# Altium PCB MotorDriver-v1.0.PcbDoc (part 3 of 3)
Units mil, origin at the board's own origin, x right, y up, seen from the top; angles counter-clockwise.
Board outline 4842.52 x 3661.42 mil, 2 copper layers (Top Layer, Bottom Layer), stack 57 mil thick; 127 components, 90 nets, 380 pads, 96 vias.
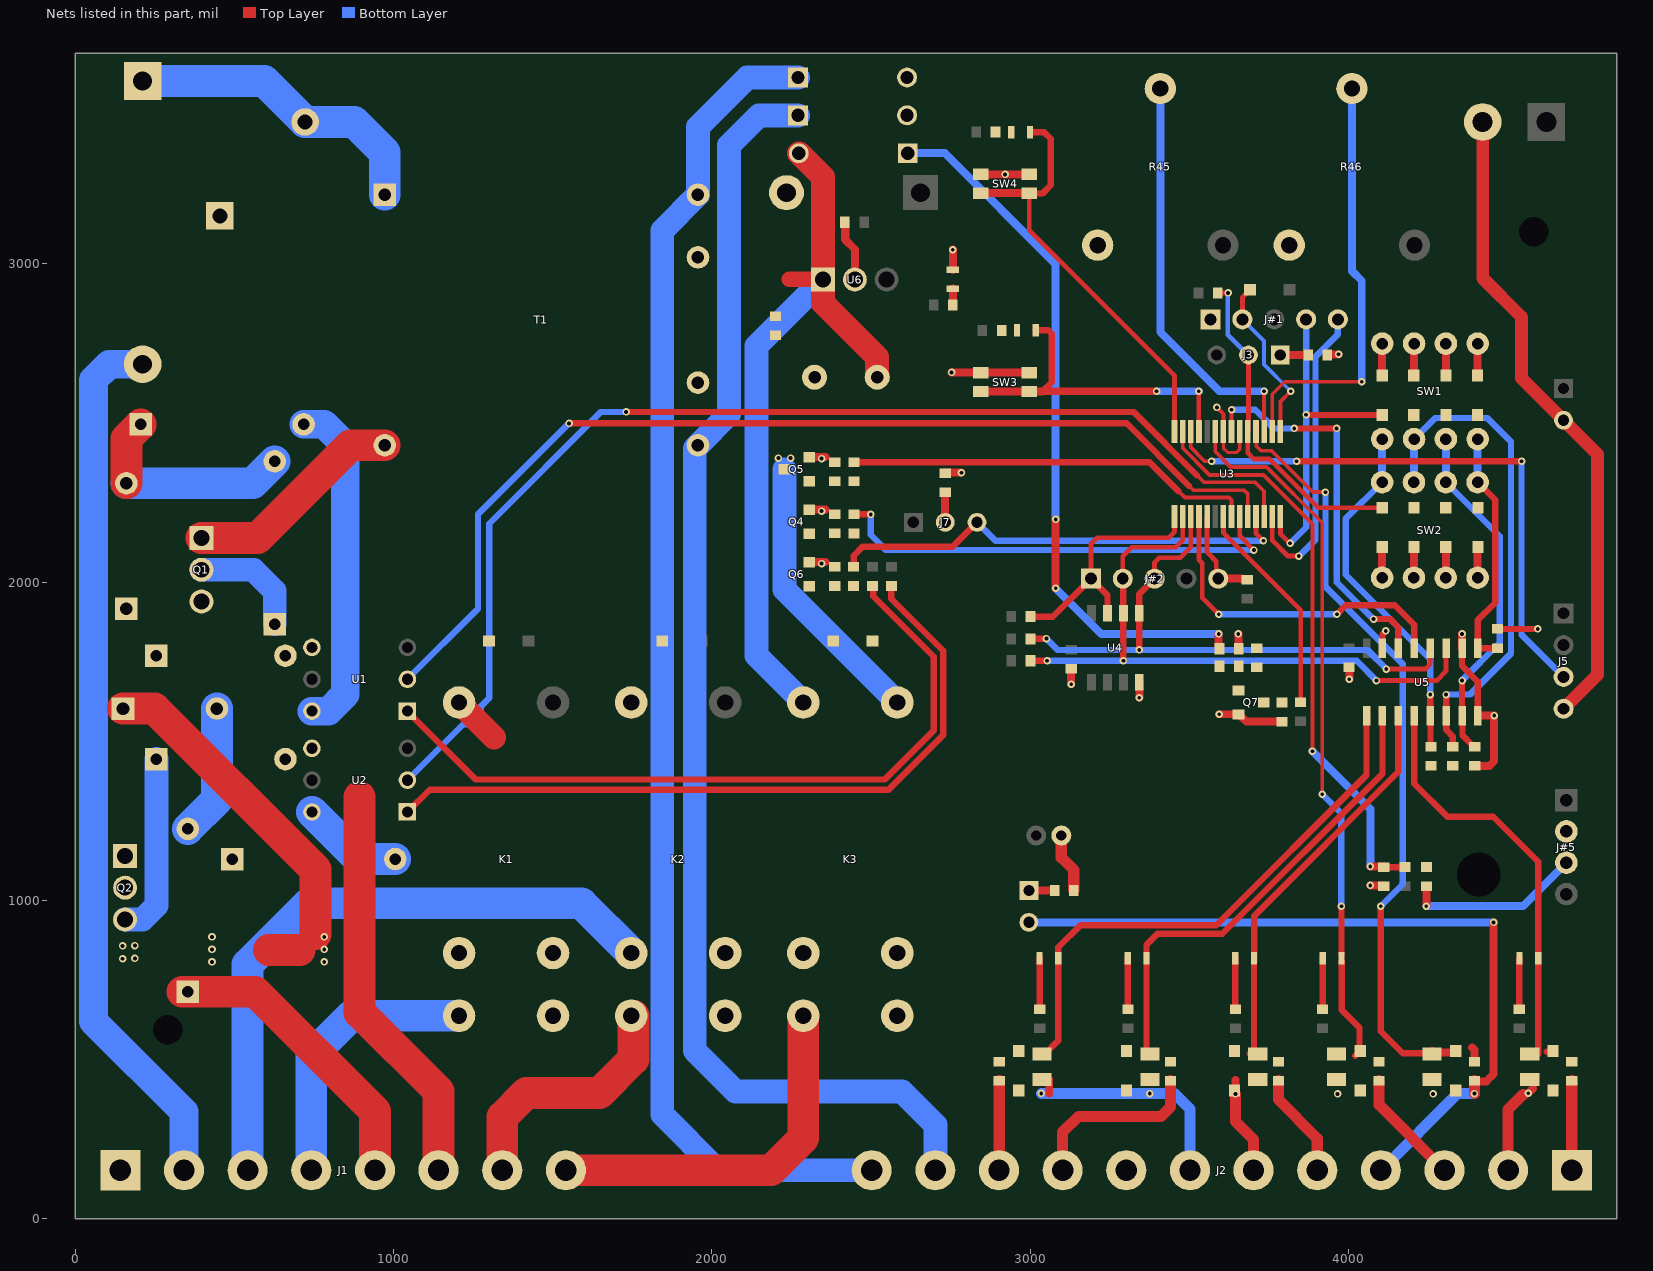
[diagram p2: the nets of this part, all layers, seen from the top]

## Via types
v1: diameter 23.62, hole 11.81, Top Layer to Bottom Layer, 96 vias

## Nets (pads, with @x,y where several pads share a name; then routed paths per layer and width w, separated by ;. In a path a pad name is that pad's centre, name@x,y a point inside that pad or via, vN(x,y) a via of type N, cw(c..) or ccw(c..) an arc to the next point about the centre after c; other vN are vias at no path point) (continued)
"Coil 3": D3.1 K3.8 Q5.3 | length 879.8
  Bottom Layer w75: 2228,2355 2228,1976.52 K3.8@2582.46,1622.06
  other v1: 2209,2390 2247,2390
Costa: J2.4 J8.2 R42.2 | length 2441.4
  Top Layer w25: R42.2@4396,433.4 4397.93,431.46 4433.46,431.46 4456,454 v1(4456,931)
  Top Layer w35: v1(4396,393) R42.2@4396,433.4
  Bottom Layer w25: J8.2@2996,931 v1(4456,931)
  Bottom Layer w35: J2.4@4102,152 4343,393 v1(4396,393)
D0: C13.2 D10.2 LED18.2 R39.1 U5.1 | length 1745.7
  Top Layer w20: C13.2@3037,517.4 3042.4,512 3042.4,513.9 3088.53,560.03 LED18.2@3088.53,818 3088.53,852.53 3158,922 3585,922 4057,1394 U5.1@4057,1579.7
D1: C14.2 D11.2 LED19.2 R40.1 U5.2 | length 1492.9
  Top Layer w20: C14.2@3375,517.4 3365.53,526.87 LED19.2@3365.53,818 3365.53,860.53 3400,895 3604,895 4107,1398 U5.2@4107,1579.7
D2: C15.2 D12.2 LED20.2 R41.1 U5.3 | length 1244.3
  Top Layer w20: C15.2@3689.03,518.5 3703.53,533 LED20.2@3703.53,798.53 ; LED20.2@3704,809.11 3704,951 4157,1404 U5.3@4157,1579.7
D3: C18.2 D14.2 LED22.2 R44.1 U5.4 | length 1315.5
  Top Layer w20: U5.4@4207,1579.7 4207,1367 4311.43,1262.57 4455.43,1262.57 4596.53,1121.47 LED22.2@4596.53,818 C18.2@4596.53,517.4 ; 4623.51,524.01 D14.2@4631,524.01
D4: R11.1 SW1.1 SW2.2 U5.5 | length 1124.8
  Top Layer w12: U5.5@4257,1579.7 U5.5@4258,1578.7 ; R11.1@4258,1484 R11.1@4259,1483
  Top Layer w15: R11.1@4258.85,1482.15 R11.1@4259,1482
  Top Layer w20: U5.5@4257,1579.7 v1(4257,1647) ; R11.1@4258,1484 U5.5@4258,1578.7
  Bottom Layer w12: SW2.2@4106,2314 SW2.2@4106.15,2314.15 ; SW1.1@4106.15,2449.53 SW1.1@4106.3,2449.68
  Bottom Layer w20: SW2.2@4106,2314 3992,2200 3992,2023 4257,1758 v1(4257,1647)
  Bottom Layer w25: SW2.2@4106.15,2314.15 SW1.1@4106.15,2449.53
D5: R16.1 SW1.3 SW2.4 U5.6 | length 1594.2
  Top Layer w20: v1(4307,1647) U5.6@4307,1579.7 4307,1536 4328,1515 R16.1@4328,1483
  Bottom Layer w20: SW2.4@4206,2314 SW2.4@4206.15,2314.15 ; SW1.3@4206.15,2449.53 SW1.3@4206.3,2449.68 4272.62,2516 4436,2516 4511,2441 4511,1776 4382,1647 v1(4307,1647)
  Bottom Layer w25: SW2.4@4206.15,2314.15 SW1.3@4206.15,2449.53
D6: R29.1 SW1.5 SW2.6 U5.7 | length 1104.5
  Top Layer w20: v1(4357,1691) U5.7@4357,1579.7 4358.52,1578.18 4358.52,1518.98 4389.5,1488 4392,1488 R29.1@4397,1483
  Bottom Layer w20: SW2.6@4306.15,2314.15 SW2.6@4306,2314 4476,2144 4476,1810 v1(4357,1691) ; SW1.5@4306.15,2449.53 SW1.5@4306.3,2449.68
  Bottom Layer w25: SW2.6@4306.15,2314.15 SW1.5@4306.15,2449.53
D7: R25.1 SW1.7 SW2.8 U5.9 | length 766.2
  Top Layer w15: U5.9@4407,1792.3 U5.9@4407.3,1792 ; 4407,1881 4408,1880
  Top Layer w20: SW2.8@4406,2314 4461,2259 4461,1935 4407,1881 U5.9@4407,1792.3 ; U5.9@4407.3,1792 4468,1792 R25.1@4469,1793
  Bottom Layer w25: SW2.8@4406.3,2314.3 SW1.7@4406.3,2449.68
DC#: C7.1 D4.1 D5.2 D6.2 R26.2 | length 2246.3
  Top Layer w25: v1(3080,1981) v1(3080,2197.06) ; v1(3592.5,1837.5) 3592.5,1793.5 C7.1@3595,1791
  Bottom Layer w25: D4.1@2616.32,3348 2732,3348 3080,3000 v1(3080,2197.06) ; v1(3080,1981) 3223.5,1837.5 v1(3592.5,1837.5)
ENC: J#5.3 R32.2 | length 559.5
  Top Layer w25: v1(4245,982) R32.2@4245,1045
  Bottom Layer w25: v1(4245,982) 4548.57,982 J#5.3@4685,1118.43
ENC#: C12.1 R31.2 R32.1 U3.13 | length 1820.2
  Top Layer w12: U3.13@3479.25,2473.86 3479.25,2421.75 3564,2337 3733,2337 3887,2183 v1(3887,1469) ; C12.1@4116,1104 C12.1@4116.25,1104.25
  Top Layer w20: v1(4069,1107) v1@4069.69,1106.31 ; C12.1@4113.69,1106.31 4116,1104 R31.2@4177.5,1104
  Top Layer w25: v1@4069.69,1106.31 C12.1@4113.69,1106.31
  Bottom Layer w25: v1(3887,1469) 4069,1287 v1(4069,1107)
GND: C3.2 C4.1 C5.2 C6.1 C7.2 C8.2 C9.2 C10.1 C11.2 C12.2 C15.1 C16.1 C17.1 C18.1 C20.1 D7.2 D9.1 D12.1 D13.1 D14.1 J2.2 J2.6 J4.2 J5.4 J#1.1 J#2.5 J#4.2 J#5.2 LED16.2 Q4.2 Q5.2 Q6.2 Q7.2 R10.1 R11.2 R13.2 R16.2 R17.2 R21.2 R25.2 R27.2 R29.2 R30.2 R45.1 R46.1 SW3.1 SW4.1 T1.7 T1.9 U3.6 U3.8 U3.19 U4.4 U5.8 U5.10 U5.15 U6.2 | length 5493.4
  Top Layer w10: U3.8@3607.2,2473.86 3607.2,2420.8 3620,2408 3649,2408 3658.39,2417.39 U3.6@3658.39,2473.86
  Top Layer w12: v1(3587,2549) 3607.2,2528.8 U3.8@3607.2,2473.86
  Top Layer w15: U3.19@3556.02,2206.14 3556.02,2093.98 3585,2065 3585,2017 J#2.5@3591,2011
  Top Layer w20: U5.15@4107,1792.3 4106.98,1836.98 v1(4117,1847) ; U5.10@4357,1792.3 4357,1737 4407,1687 U5.8@4407,1579.7 ; R25.2@4469,1853 v1(4595,1853)
  Top Layer w25: Q6.2@2307.37,2063.4 2357.37,2063.4 ; Q4.2@2307.37,2228.4 2357.37,2228.4 ; Q5.2@2307.37,2393.4 2357.37,2393.4 ; C3.2@2418,3131 2418,3077 2449,3046 U6.2@2449,2951 ; 2419,3085.29 C3.2@2419,3135.29 ; C6.1@2734,2344 v1(2784,2344) ; v1(2753,2659) 2753.47,2658.53 SW3.1@2845.21,2658.53 SW3.1@2996.79,2658.53 ; LED16.2@2757,2981.53 v1(2757,3045) ; SW4.1@2845.21,3281.53 v1(2921,3281.53) SW4.1@2996.79,3281.53 ; v1(3129,1679.27) C8.2@3129,1728 ; R45.1@3212.15,3058.94 R45.1@3214.21,3061 ; v1(3343,1637) U4.4@3343,1685.73 ; J#2.5@3591,2011 3591.11,2010.89 3664.28,2010.89 3664.68,2010.5 3679.5,2010.5 C20.1@3682,2008 ; v1(3594,1585) 3654.23,1585 Q7.2@3654.63,1584.6 3656.6,1584.6 3679.2,1562 C9.2@3791,1562 ; v1(3645,392) 3645,436 ; C7.2@3654,1792 v1(3654,1837.5) ; R10.1@3934,2714 3936,2716 v1(3969,2716) ; v1(4003,1695) C10.1@4003,1733 ; v1@4069.69,1046.31 C12.2@4113.69,1046.31 ; U5.10@4357,1792.3 v1(4357,1837.5) ; R29.2@4397,1423 4443.36,1423 4458,1437.64 v1(4458,1580.7) U5.8@4408,1580.7 ; 4548.5,389.5 4553.04,394.04 v1(4564.99,394.04) 4579.76,408.8 ; C18.1@4565,437.4 4567.5,437.4 C18.1@4575,429.9
  Top Layer w35: C11.2@3097.74,1204 3097.74,1134.26 3137,1095 R30.2@3137,1032 ; v1(3645,392) 3645,305 3702,248 J2.6@3702,152 ; J2.2@4502,152 4502,343 4548.5,389.5
  Top Layer w40: J#4.2@4422,3446 4422,2955 4544,2833 4544,2641 J4.2@4676,2509 4783,2402 4783,1709.26 J5.4@4676.07,1602.34
  other v1: 3966,392 4266,392 4069,1047 2344.37,2058.4 2344.37,2223.4 2344.37,2388.4
LINE: J1.2 J1.3 J10.2 K2.3 K2.6 K3.3 K3.6 | length 4776.9
  Bottom Layer w75: J10.2@208.13,2682.25 J10.2@211,2685.12
  Bottom Layer w90: J10.2@211,2685.12 106.22,2685.12 56.43,2635.33 56.43,620.57 341,336 J1.2@341,152
  Bottom Layer w100: J1.3@541,152 541,799 733,991 1589.84,991 K2.3@1746.18,834.66
LSC: J2.10 R39.2 | length 280.4
  Top Layer w35: J2.10@2903,153 R39.2@2903,433.4
LSO: J2.9 R40.2 | length 573.8
  Top Layer w35: J2.9@3102,152 3102,272 3151.32,321.32 3410.81,321.32 3441,351.52 R40.2@3441,433.4
NetC2_2: C2.2 R5.1 R6.2 | length 416.1
  Bottom Layer w100: R6.2@353,1224.81 444.64,1316.45 C2.2@444.64,1603
NetC6_2: C6.2 J7.2 | length 95
  Top Layer w25: J7.2@2733,2188 C6.2@2733,2283
NetC19_2: C19.2 R1.1 R2.2 | length 698.4
  Top Layer w100: C19.2@160,2310.85 160,2450.91 R1.1@205.09,2496
  Bottom Layer w100: C19.2@160,2310.85 556.94,2310.85 R2.2@626,2379.91
NetJ3_1: J3.1 R10.2 | length 88
  Top Layer w25: J3.1@3786,2714 R10.2@3874,2714
NetJ8_1: J8.1 R30.1 | length 81
  Top Layer w25: J8.1@2996,1031 R30.1@3077,1031
NetJ10_1: J10.1 RV1.2 T1.1 | length 986.4
  Bottom Layer w100: J10.1@211,3574.88 593.11,3574.88 RV1.2@721.72,3446.28 875.72,3446.28 971.87,3350.13 T1.1@971.87,3217.7
NetLED15_1: LED15.1 R7.2
NetLED16_1: LED16.1 R8.2 | length 51.5
  Top Layer w25: R8.2@2757,2871 LED16.1@2757,2922.47
NetLED17_1: LED17.1 R9.2
NetLED18_1: LED18.1 R33.2 | length 159.8
  Top Layer w20: LED18.1@3029.74,817.74 3029.74,658.77 R33.2@3030,658.51
  Top Layer w25: R33.2@3030,658 R33.2@3030,658.51
NetLED19_1: LED19.1 R34.2 | length 159.8
  Top Layer w20: LED19.1@3306.74,817.74 3306.74,658.77 R34.2@3307,658.51
  Top Layer w25: R34.2@3307,658 R34.2@3307,658.51
NetLED20_1: LED20.1 R35.2 | length 159.8
  Top Layer w20: LED20.1@3644.74,817.74 3644.74,658.77 R35.2@3645,658.51
  Top Layer w25: R35.2@3645,658 R35.2@3645,658.51
NetLED21_1: LED21.1 R36.2 | length 159.7
  Top Layer w20: R36.2@3919,658.51 3919,808 3919.47,808.47 LED21.1@3919.47,818
NetLED22_1: LED22.1 R38.2 | length 159.5
  Top Layer w20: R38.2@4537,658.51 LED22.1@4537,818
NetQ1_3: Q1.3 R3.1
NetQ2_3: Q2.3 R4.1 | length 576.4
  Bottom Layer w75: Q2.3@156,940 210.25,940.04 254.24,984.03 R4.1@254.24,1444
NetQ4_1: Q4.1 R13.1 R14.1
NetQ5_1: Q5.1 R17.1 R18.1
NetQ6_1: Q6.1 R21.1 R22.1
NetQ7_1: Q7.1 R26.1 R27.1
NetR1_2: R1.2 U1.6 | length 1067.4
  Bottom Layer w90: R1.2@716.91,2496 782,2496 848,2430 848,1648 795,1595 U1.6@743,1595
NetR3_2: R3.2 U1.4
NetR4_2: R4.2 U2.4
NetR5_2: R5.2 U2.6 | length 323.2
  Bottom Layer w100: U2.6@743,1278 891,1130 R5.2@1004.91,1130
NetR23_1: R23.1 U1.1 | length 2340.5
  Top Layer w20: U1.1@1043,1595 1258,1380 2543,1380 2697,1534 2697,1766 2507.3,1955.7 2507.3,1985.37 R23.1@2504.67,1988
NetR24_1: R24.1 U2.1 | length 2319.8
  Top Layer w20: U2.1@1043,1278 1112.78,1347.78 2554.78,1347.78 2727,1520 2727,1785 2564,1948 R24.1@2564,1988
Neutral: C2.1 C19.1 J1.1 K1.3 K1.6 Q1.1 Q2.1 RV1.1 T1.5 | length 1811.1
  Top Layer w100: C2.1@149.36,1603 248,1603 754,1097 754,893.81 ; Q1.1@396,2139 573,2139 864.3,2430.3 T1.5@971.87,2430.3 ; 608,844.5 704.69,844.5
  Bottom Layer w50: K1.3@1192.02,835 K1.3@1192.36,834.66
  other v1: 429,806.8 782,806.8 147.81,816.8 187,817.8 429,846 782,846 147.81,857 187,858 429,885.2 782,885.2
OPT1: J1.5 Q2.2 R6.1 | length 945.7
  Top Layer w100: R6.1@336,713 565,713 941,337 J1.5@941,152
OPT2: J1.6 Q1.2 R2.1 | length 1638.5
  Top Layer w100: 893,1325.48 893,648 1141,400 J1.6@1141,152
  Bottom Layer w75: Q1.2@396,2039 560,2039 626,1973 R2.1@626,1868.09
PED.: J2.3 R43.2 | length 366.7
  Top Layer w35: R43.2@4096,433.4 4096,358 J2.3@4302,152
PHO: J2.5 R41.2 | length 331.9
  Top Layer w35: R41.2@3780,433.4 3780,374 3902,252 J2.5@3902,152
PRG: LED15.2 SW4.2 U3.14 | length 1387.5
  Top Layer w15: SW4.2@2996.79,3222.47 2996.79,3105.21 3453.66,2648.34 3453.66,2526.34 U3.14@3453.66,2473.86
  Top Layer w20: SW4.2@2997.87,3221.39 3038.61,3221.39 3065,3247.77 3065,3393 3044.67,3413.33 ; LED15.2@2999.53,3414 3044,3414
  Top Layer w25: SW4.2@2845.21,3222.47 SW4.2@2996.79,3222.47 SW4.2@2997.87,3221.39
PRT: LED17.2 SW3.2 U3.11 | length 1058.2
  Top Layer w15: U3.11@3530,2474.29 v1(3530,2600)
  Top Layer w20: LED17.2@3017.53,2792 3056.28,2792 3068,2780.28 3068,2628.76 3038.71,2599.47
  Top Layer w25: SW3.2@2845.21,2599.47 SW3.2@2996.79,2599.47 3038.71,2599.47 ; 3039.24,2600 v1(3397,2600)
  Bottom Layer w25: v1(3397,2600) v1(3530,2600)
RA0: R46.2 U3.2 | length 1348.3
  Top Layer w12: U3.2@3760.75,2473.86 3760.75,2590.75 3800,2630 v1(4042,2630)
  Bottom Layer w25: R46.2@4011,3551.06 4011,2978 4042,2947 v1(4042,2630)
RA1: R45.2 U3.3 | length 1294.4
  Top Layer w12: U3.3@3735.16,2473.86 v1(3735.16,2600)
  Bottom Layer w25: R45.2@3409,3551.06 3409,2786 3595,2600 v1(3735.16,2600)
RA2: C16.2 D9.2 R42.1 U3.4 | length 2439.7
  Top Layer w12: U3.4@3709.57,2473.86 3710.22,2473.21 3710.22,2427.78 3725,2413 3758,2413 3888,2283 v1(3928,2283)
  Top Layer w20: v1(4102,982) 4102,589 4171,520 4260.4,520 C16.2@4263,517.4
  Top Layer w25: C16.2@4263,521.5 4314.5,521.5 ; C16.2@4263.69,524.9 C16.2@4263.69,526.36 ; 4388,538.28 4395.99,530.28 R42.1@4395.99,492.89
  Bottom Layer w20: v1(3928,2283) 3928,1986 4171,1743 4171,1051 v1(4102,982)
RA3: D#2.1 D#3.1 D#4.1 D#5.1 J3.2 R12.1 U3.5 | length 1059.4
  Top Layer w15: R12.1@3590,2908 R12.1@3589,2909 v1(3622,2909) ; J3.2@3686,2714 3686,2510.55 3685.33,2509.89 3685.33,2475.22 U3.5@3683.98,2473.86 3683.98,2406.02 3703,2387 3753,2387 3905.99,2234.01 D#2.1@4106,2234.01
  Bottom Layer w15: v1(3622,2909) 3621,2908 3621,2777 J3.2@3685,2713
RA5: U3.7 U5.14 | length 1224.1
  Top Layer w12: U3.7@3632.8,2473.86 v1@3632.8,2541.8
  Top Layer w20: v1(3830,2483) v1(3963,2483) ; v1(4079,1884) 4079.19,1884.19 4130.81,1884.19 4157,1858 U5.14@4157,1792.3
  Bottom Layer w20: v1(3633,2542) 3707,2542 3766,2483 v1(3830,2483) ; v1(3963,2483) 3963,2000 v1(4079,1884)
RA7: C17.2 D13.2 LED21.2 R43.1 U3.9 | length 2202
  Top Layer w12: U3.9@3581.61,2473.86 3581.61,2410.39 3630,2362 3743,2362 3918,2187 v1(3918,1334)
  Top Layer w20: v1(3978,982) 3978.37,981.63 LED21.2@3978.37,827.69 ; LED21.2@3978.53,808.31 3978.53,656.47 4035,600 4035,525.51 D13.2@4021.49,512
  Bottom Layer w20: v1(3918,1334) 3978,1274 v1(3978,982)
RB0: C9.1 Q7.3 R28.1 U3.21 | length 683.7
  Top Layer w15: U3.21@3607.2,2206.14 3607.2,2154.8 3850,1912 3850,1719.53 R28.1@3850,1623
RB1: R18.2 U3.22 | length 1288.1
  Top Layer w12: 3466.08,2285.92 3486,2266 3625,2266 3632.8,2258.2 U3.22@3632.8,2206.14
  Top Layer w20: R18.2@2446,2377 3375,2377 3466.08,2285.92
RB2: R14.2 U3.23 | length 1464.8
  Top Layer w12: U3.23@3658.39,2206.14 U3.23@3658.69,2205.83
  Top Layer w15: U3.23@3658.69,2205.83 3658.69,2145.31 v1(3703,2101)
  Top Layer w20: R14.2@2446,2213 v1(2499,2213)
  Bottom Layer w20: v1(2499,2213) 2499,2148.55 2546.55,2101 v1(3703,2101)
RB3: U1.2 U3.24 | length 3310.2
  Top Layer w12: 3498.47,2303.53 3513,2289 3672,2289 3683.98,2277.02 U3.24@3683.98,2206.14
  Top Layer w20: v1(1551,2499) 3303,2499 3498.47,2303.53
  Bottom Layer w20: U1.2@1043,1695 1265,1917 1265,2213 v1(1551,2499)
RB4: J7.3 R22.2 U3.25 | length 1476.2
  Top Layer w15: U3.25@3709.57,2206.14 3709.57,2153.43 v1(3733,2130)
  Top Layer w20: R22.2@2445.33,2048 2445.33,2083.33 2473,2111 2756,2111 J7.3@2833,2188
  Bottom Layer w20: J7.3@2833,2188 2891,2130 v1(3733,2130)
RB5: U2.2 U3.26 | length 3684.5
  Top Layer w12: 3523.99,2336.01 3546,2314 3707,2314 3735.16,2285.84 U3.26@3735.16,2206.14
  Top Layer w20: v1(1730,2535) 3325,2535 3523.99,2336.01
  Bottom Layer w20: U2.2@1043,1378 1218.88,1553.88 1233.6,1553.88 1273.54,1593.82 1273.54,1609.54 1300,1636 1300,2184 1651,2535 v1(1730,2535)
RB6: J#1.5 U3.27 | length 974.1
  Top Layer w15: U3.27@3760.75,2206.14 3760.75,2131.25 3809.69,2082.31 3843.69,2082.31 v1(3844,2082)
  Bottom Layer w20: v1(3844,2082) 3844.98,2082 3896.81,2133.83 3896.81,2708.19 3967,2778.38 J#1.5@3967,2826
RB7: D#6.1 D#7.1 D#8.1 D#9.1 J#1.4 U3.28 | length 1061.4
  Top Layer w15: U3.28@3786.34,2206.14 3786.34,2151.72 3816.06,2122 v1(3816.81,2122)
  Top Layer w20: v1(3867,2526) 3867.5,2525.5 4105.5,2525.5 D#6.1@4106,2524.99
  Bottom Layer w20: v1(3816.81,2122) 3867,2172.19 v1(3867,2526) J#1.4@3867,2826
RC1: J5.3 U3.12 | length 1840.1
  Top Layer w12: U3.12@3504.84,2473.86 3504.84,2423.16 3548,2380 v1(3570,2380)
  Top Layer w20: v1(3837.04,2380) v1(4544,2380)
  Bottom Layer w20: v1(3570,2380) v1(3837.04,2380) ; v1(4544,2380) 4544,1834.41 J5.3@4676.07,1702.34
RC4: J#2.1 R20.1 U3.15 U4.7 | length 805.3
  Top Layer w15: J#2.1@3191,2011 3191,2120 3211,2140 3435,2140 3453.66,2158.66 U3.15@3453.66,2206.14
  Top Layer w20: R20.1@3001,1892 3001.69,1891.31 3071.31,1891.31 J#2.1@3191,2011 3243,1959 U4.7@3243,1902.27
RC5: J#2.2 R19.1 U3.16 U4.6 U5.11 | length 2028.8
  Top Layer w15: J#2.2@3291,2011 3291,2082 3319,2110 3458,2110 3479.25,2131.25 U3.16@3479.25,2206.14 ; v1(4088,1691) 4277,1691 4307,1721 U5.11@4307,1792.3
  Top Layer w20: R19.1@3001,1753 v1(3053,1753) ; J#2.2@3291,2011 3293,2009 U4.6@3293,1902.27 v1(3293,1753)
  Bottom Layer w20: v1(3053,1753) v1(3293,1753) 4026,1753 v1(4088,1691)
RC6: J#2.3 R15.1 U3.17 U4.5 U5.12 | length 1878.6
  Top Layer w15: J#2.3@3391,2011 3391,2063 3405,2077 3472,2077 3504.84,2109.84 U3.17@3504.84,2206.14 ; v1(4119.19,1727) 4242,1727 4257,1742 U5.12@4257,1792.3
  Top Layer w20: R15.1@3001,1822 3001.5,1822.5 3050.52,1822.5 v1(3051.02,1823) ; v1(3343,1787) U4.5@3343,1902.27 3343,1963 J#2.3@3391,2011
  Bottom Layer w20: v1(3051.02,1823) 3087.02,1787 v1(3343,1787) 4060,1787 4119.19,1727.81 v1(4119.19,1727)
RC7: U3.18 U5.13 | length 1057.9
  Top Layer w15: U3.18@3530.43,2206.14 3530.43,2070.57 3541,2060 3541,1950.5 v1(3592.5,1899)
  Top Layer w20: v1(3964,1899) 3992,1927 4146,1927 4207,1866 U5.13@4207,1792.3
  Bottom Layer w20: v1(3592.5,1899) v1(3964,1899)
RE3: D8.2 J#1.2 U3.1 | length 532.1
  Top Layer w12: U3.1@3786.34,2473.86 3786.34,2567.34 v1(3819,2600)
  Top Layer w15: J#1.2@3667,2826 3667,2895.01 3679.79,2907.8 3679.79,2908.78 3690.01,2919 D8.2@3690.99,2919
  Bottom Layer w12: J#1.2@3667,2826 3735,2758 3735,2684 v1(3819,2600)
RK1: J1.4 K1.4 K1.5 | length 863.5
  Bottom Layer w100: J1.4@741,152 741,512 866.81,637.81 K1.4@1192.36,637.81
RK2: J1.7 K2.4 K2.5 | length 791.3
  Top Layer w100: J1.7@1341,152 1341,319 1417,395 1647,395 1753.18,501.18 K2.4@1753.18,637.81
RK3: J1.8 K3.4 K3.5 | length 1172.7
  Top Layer w100: J1.8@1541,152 2186,152 2287.18,253.18 K3.4@2287.18,637.81
Sd1: D#2.2 SW2.1 | length 95
  Top Layer w25: SW2.1@4106,2014 D#2.2@4106,2108.99
Sd1#: D#6.2 SW1.2 | length 100.8
  Top Layer w25: D#6.2@4106,2649.01 4106.15,2649.16 4106.15,2749.53 SW1.2@4106.3,2749.68
Sd2: D#3.2 SW2.3 | length 96
  Top Layer w25: SW2.3@4206,2014 D#3.2@4206,2109.99
Sd2#: D#7.2 SW1.4 | length 101.2
  Top Layer w25: D#7.2@4205,2649.01 4205.65,2649.66 4205.65,2749.03 SW1.4@4206.3,2749.68
Sd3: D#4.2 SW2.5 | length 96
  Top Layer w25: SW2.5@4306,2014 D#4.2@4306,2109.99
Sd3#: D#8.2 SW1.6 | length 101
  Top Layer w25: SW1.6@4306.3,2749.68 4306.65,2749.33 4306.65,2649.36 D#8.2@4307,2649.01
Sd4: D#5.2 SW2.7 | length 96
  Top Layer w25: SW2.7@4406,2014 D#5.2@4406,2109.99
Sd4#: D#9.2 SW1.8 | length 101
  Top Layer w20: 4405.85,2674.16 4406,2674.01
  Top Layer w25: D#9.2@4406,2649.01 4406.15,2649.16 4406.15,2749.53 SW1.8@4406.3,2749.68
Start: J2.1 R44.2 | length 281.4
  Top Layer w35: J2.1@4702,152 R44.2@4702,433.4
Stop: C13.1 C14.1 D10.1 D11.1 J2.7 J2.8 | length 726
  Top Layer w25: 3060,393.4 C13.1@3060,437.4 ; J2.8@3299.5,176.5 J2.8@3302,176.5
  Bottom Layer w35: v1@3035.4,393 v1(3376,393) 3454,393 3502,345 J2.7@3502,152
  other v1: 3035,393.4
TS1: D5.1 J2.11 T1.6 | length 4141.1
  Bottom Layer w75: D5.1@2270.74,3467 2148,3467 2054,3373 2054,2528.17 T1.6@1956.13,2430.3 1945.78,2419.95 1945.78,598.18 1945.78,528.22 2074,400 2597,400 2702,295 J2.11@2702,152
TS2: D6.1 J2.12 T1.10 | length 4259.7
  Bottom Layer w75: D6.1@2270.74,3586 2111,3586 1956.13,3431.13 T1.10@1956.13,3217.7 1844,3105.57 1844,327.17 2019.17,152 J2.12@2502,152
VIN: C4.2 C5.1 D1.2 D2.2 D3.2 D4.2 K1.1 K2.1 K3.1 U6.1 | length 2543.3
  Top Layer w25: U6.1@2348,2952 U6.1@2349,2951
  Top Layer w50: 2244,2952 U6.1@2348,2952
  Top Layer w75: K1.1@1205.36,1622.06 1315.43,1512 ; D4.2@2273.8,3348 2349,3272.8 U6.1@2349,2951 2349.1,2950.9 2349.1,2877.9 2518.82,2708.18 2518.82,2644.6 C5.1@2519.43,2644
  Bottom Layer w75: K3.1@2287.18,1622.06 2140,1769.24 2140,2742 U6.1@2349,2951
pads on no net: J3.3 J5.2 J7.1 J#5.4 U1.3 U1.5 U2.3 U2.5 U3.10 U4.1 U4.2 U4.3

## Polygon pours and split planes (outlines as drawn)
LSO on Top Layer "LSO_L01_P024" (solid, remove dead copper, pour order 24): 22,3636 4823,3636 4823,20 22,20
"Coil 1" on Top Layer "COIL_1_L01_P017" (solid, remove dead copper, pour order 17): 1393.18,1561 1393.18,1847 1471.03,1847 1471.03,1775.35 1570.18,1676.2 1570.18,1561
GND on Top Layer "GND_L01_P023" (solid, remove dead copper, pour order 23): 2182.2,2587 2182.2,2792.52 2263.2,2792.52 2370,2685.72 2370,2587
VIN on Top Layer "VIN_L01_P021" (solid, remove dead copper, pour order 21): 1864.23,1429 1864.23,1847 1786.38,1847 1786.38,1782.03 1687.23,1682.89 1687.23,1429
VIN on Top Layer "VIN_L01_P020" (solid, remove dead copper, pour order 20): 1319.23,1425 1319.23,1847 1241.38,1847 1241.38,1782.03 1142.23,1682.89 1142.23,1425
VIN on Top Layer "VIN_L01_P018" (solid, remove dead copper, pour order 18): 2401.32,1429 2401.32,1847 2323.47,1847 2323.47,1782.03 2224.32,1682.89 2224.32,1429
"Coil 3" on Top Layer "COIL_3_L01_P016" (solid, remove dead copper, pour order 16): 2475,1561 2475,1847 2552.85,1847 2552.85,1775.35 2652,1676.2 2652,1561
"Coil 2" on Top Layer "COIL_2_L01_P014" (solid, remove dead copper, pour order 14): 1934,1561 1934,1847 2011.85,1847 2011.85,1775.35 2111,1676.2 2111,1561
VIN on Top Layer "VIN_L01_P013" (solid, remove dead copper, pour order 13): 2179,2996 2390,2996 2390,2813 2235,2813 2179,2813
Neutral on Top Layer "NEUTRAL_L01_P012" (solid, remove dead copper, pour order 12): 508,3204 404,3204 404,3014 343,3014 343,2089 508,2089
NetQ1_3 on Top Layer "NETQ1_3_L01_P011" (solid, remove dead copper, pour order 11): 443,1985 348,1985 348,1815 212.81,1815 212.81,1724 443,1724
Neutral on Top Layer "NEUTRAL_L01_P009" (solid, remove dead copper, pour order 9): 78.36,2197 201,2197 201,1096 78.36,1096
Neutral on Top Layer "NEUTRAL_L01_P008" (solid, remove dead copper, pour order 8): 90,2087 508.21,2087 508.21,2196.8 90,2196.8
NetC2_2 on Top Layer "NETC2_2_L01_P005" (solid, remove dead copper, pour order 5): 491.24,1188.5 378.53,1275.5 301,1275.5 301,1168 343.69,1168 459.45,1076 546.61,1076 546.61,1188.5
NetR4_2 on Top Layer "NETR4_2_L01_P004" (solid, remove dead copper, pour order 4): 609,1516 780,1516 780,1435 727,1435 687,1395 609,1395
NetR3_2 on Top Layer "NETR3_2_L01_P003" (solid, remove dead copper, pour order 3): 713,1820 720,1827 780,1827 780,1751 718,1751 687,1720 609,1720 609,1820
GND on Bottom Layer "GND_L02_P025" (solid, remove dead copper, pour order 25): 22,3636 4823,3636 4823,20 22,20
Neutral on Bottom Layer "NEUTRAL_L02_P006" (solid, remove dead copper, pour order 6): 446,787 126,787 126,883 237,883 257,903 446,903

## Other copper
Top Layer:
  rectangle net "Coil 1": 2002.44,1985 2255.07,2064
  rectangle net "Coil 2": 2003.37,2163 2256,2217
  region net VIN: 2402,1543 1244,1543 1244,1425 2402,1425
  region net Neutral: 213,76 213,884 71,884 71,76
  rectangle net OPT1: 107,993 398,1084
  region net OPT1: 273,1037.86 273,663 398,663 398,1037.86
  region net Neutral: 807,903 409,903 409,786 807,786
  region net OPT2: 952,739 952,1911.97 834,1911.97 834,739
  region net GND: 2016.13,3070.28 1906,3070.28 1906,2582 2016.13,2582
  region net GND: 2370,2584 2370,2689 1907,2689 1907,2584
  rectangle net LINE: 257,52 613,249
  rectangle net LINE: 1678,766.85 2657,903.85
  rectangle net Neutral: 1137.18,766.85 1573.18,903.85
  rectangle net RK1: 1137.18,570 1573.18,707
  rectangle net RK3: 2219,570 2655,707
  rectangle net OPT2: 585,1834 952,1930
  region net "Coil 1": 2253.77,1999.37 2253.77,2050.37 2162.63,2050.37 2162.63,1999.37
  region net "Coil 2": 2253.77,2164.37 2253.77,2215.37 2162.63,2215.37 2162.63,2164.37
  rectangle net "Coil 3": 2190,2338.86 2265,2406
  rectangle net RB7: 4078,2495.98 4437,2547.98
  region net 5V: 2808,3431 2808,3382 2853,3382 2853,3431
  region net 5V: 2963,1731 2963,1916 2919,1916 2919,1731
  rectangle net 5V: 3973,1759 4072,1855
  rectangle net 5V: 3746,2878 3834,2950
  region net GND: 4367,455.6 4226,455.6 4226,375.6 4367,375.6
  region net GND: 4067,455.6 3926,455.6 3926,375.6 4067,375.6
  region net RA7: 4113.99,545 3929,545 3929,479 4113.99,479
  region net RA2: 4413.99,554 4229,554 4229,479 4413.99,479
  rectangle net GND: 4536,377 4672,457
  region net D3: 4719.98,545.52 4534.99,545.52 4534.99,479.52 4719.98,479.52
  region net D2: 3797.99,545 3613,545 3613,479 3797.99,479
  rectangle net Stop: 3274,376 3412,459
  region net D1: 3458.99,545 3274,545 3274,479 3458.99,479
  rectangle net Stop: 3229,72 3579,234
  rectangle net RK2: 1678,570 2114,707
  rectangle net GND: 3611,375.6 3752,455.6
  rectangle net GND: 4241.5,1406 4414.5,1440
  rectangle net 5V: 2926,1735.5 2956,1909.5
  rectangle net 5V: 2495.5,2033 2589.5,2063
  rectangle net NetLED17_1: 2895,2772 2969.32,2812.69
  rectangle net NetLED15_1: 2876,3394.31 2950.32,3435
  rectangle net ENC#: 4088.5,1087 4267.5,1122
  rectangle net GND: 2288.37,2197 2403.5,2243.52
  rectangle net GND: 2288.37,2362 2403.5,2408.52
  region net GND: 3733,1809 3638.5,1809 3638.5,1769.5 3733,1769.5
  region net DC#: 3613,1716 3613,1810.5 3573.5,1810.5 3573.5,1716
  rectangle net NetQ7_1: 3640,1714 3729.5,1753.5
  rectangle net NetQ7_1: 3634,1643.26 3672.74,1753.5
  rectangle net RB0: 3715.26,1605 3867.5,1640
  rectangle net RA3: 4078,2205 4437,2257
  rectangle net NetQ5_1: 2288.26,2298 2463.5,2333.74
  rectangle net NetQ4_1: 2288.26,2133 2463.5,2168.74
  rectangle net Stop: 2935,376 3073,459
  rectangle net D0: 2885,479 3073.5,545
  rectangle net DC#: 2558,3296 2671,3633
  rectangle net GND: 2288.26,2033 2403.5,2078.54
  rectangle net NetQ6_1: 2288.26,1968 2463.5,2003.74
Bottom Layer:
  region net "Coil 2": 2079,2218 2004,2218 2004,2150.86 2079,2150.86
  region net "Coil 3": 2266,2406 2191,2406 2191,2338.86 2266,2338.86
  region net Neutral: 1265,904.13 755.02,904.13 755.02,764 1265,764

## Silkscreen, mask and mechanical layers (free items; w line width, h text height)
Top Overlay:
  drawing of 79 lines, arcs and shapes, not listed
  text "-" at 3145,3574.5 h75
  text "+" at 3673,3574.5 h75
  text "-" at 3747,3574.5 h75
  text "+" at 4275,3574.5 h75
  text "PROG." at 2747.63,3333 h35
  text "RADIO" at 2898.59,3333 h35
  text "ANT" at 4701,3110.02 h45 r90
  text "POWER" at 3869.25,2953 h55
  text "POWER" at 3076.25,2937.79 h52
  text "SLOW" at 3413.77,2937.79 h52
  text "ON" at 2788.51,2927 h45
  text "FUSE 6A" at 418,2919.29 h40 r270
  text "OPTIONS" at 4060.13,2810 h55
  text "PROG." at 2783.63,2705 h35
  text "TIME" at 2943.24,2704 h35
  text "P.RADIO" at 3153.05,2668 h55
  text "M.TYPE" at 2568.34,2069 h45
  text "VIS" at 3405.21,1882 h55
  text "ENCODER" at 4483,1384.79 h50 r270
  text "REC-SD" at 2711,1126.76 h85 r270
  text "STOP" at 3140.53,909.01 h45
  text "PHOTOC" at 3577.7,723 h40
  text "L.S.C" at 3001.36,722.73 h40
  text "L.S.O" at 3278.89,722.73 h40
  text "PED." at 3915.21,722.73 h40
  text "START" at 4485.7,722.73 h40
  text "220V AC" at 745.05,644 h45
  text "FLASH" at 831.7,509 h40
  text "LAMP" at 553.69,494.73 h40
  text "M" at 1198.01,466 h75
Board Outline:
  drawing of 158 lines, arcs and shapes, not listed
Fabrication:
  drawing of 191 lines, arcs and shapes, not listed
  text "Layer" at 5376.34,3784 h60
  text "Name" at 5786.26,3784 h60
  text "Material" at 6716,3784 h60
  text "Thickness" at 7575.77,3784 h60
  text "Constant" at 8225.6,3784 h60
  text "Board Layer Stack" at 8795.46,3784 h60
  text "Top Overlay" at 5786.26,3664 h60
  text "Top Solder" at 5786.26,3544 h60
  text "Solder Resist" at 6716,3544 h60
  text "3.00mil" at 7575.77,3544 h60
  text "3.5" at 8225.6,3544 h60
  text "1" at 5376.34,3424 h60
  text "Top Layer" at 5786.26,3424 h60
  text "10.00mil" at 7575.77,3424 h60
  text "Dielectric 1" at 5786.26,3304 h60
  text "FR-4" at 6716,3304 h60
  text "37.00mil" at 7575.77,3304 h60
  text "4.8" at 8225.6,3304 h60
  text "2" at 5376.34,3184 h60
  text "Bottom Layer" at 5786.26,3184 h60
  text "10.00mil" at 7575.77,3184 h60
  text "Bottom Solder" at 5786.26,3064 h60
  text "Solder Resist" at 6716,3064 h60
  text "3.00mil" at 7575.77,3064 h60
  text "3.5" at 8225.6,3064 h60
  text "Bottom Overlay" at 5786.26,2944 h60
  text "Total board thickness:" at 5376.34,2824 h60
  text "63.00mil" at 7575.77,2824 h60
Drill Drawing:
  drawing of 186 lines, arcs and shapes, not listed
  text "Symbol" at 221.54,6666 h72
  text "Count" at 727.42,6666 h72
  text "Hole Size" at 1327.26,6666 h72
  text "Plated" at 2476.92,6666 h72
  text "Hole Type" at 2982.8,6666 h72
  text "Drill Layer Pair" at 3716.6,6666 h72
  text "Via/Pad" at 5216.15,6666 h72
  text "Pad Shape" at 5806,6666 h72
  text "Template" at 6551.8,6666 h72
  text "96" at 727.42,6516 h60
  text "11.81mil (0.300mm)" at 1327.26,6516 h60
  text "PTH" at 2476.92,6516 h60
  text "Round" at 2982.8,6516 h60
  text "Top Layer - Bottom Layer" at 3716.6,6516 h60
  text "Via" at 5216.15,6516 h60
  text "Rounded" at 5806,6516 h60
  text "v60h30" at 6551.8,6516 h60
  text "2" at 727.42,6366 h60
  text "32.28mil (0.820mm)" at 1327.26,6366 h60
  text "PTH" at 2476.92,6366 h60
  text "Round" at 2982.8,6366 h60
  text "Top Layer - Bottom Layer" at 3716.6,6366 h60
  text "Pad" at 5216.15,6366 h60
  text "Rounded" at 5806,6366 h60
  text "c160h82" at 6551.8,6366 h60
  text "22" at 727.42,6216 h60
  text "35.43mil (0.900mm)" at 1327.26,6216 h60
  text "PTH" at 2476.92,6216 h60
  text "Round" at 2982.8,6216 h60
  text "Top Layer - Bottom Layer" at 3716.6,6216 h60
  text "Pad" at 5216.15,6216 h60
  text "(Mixed)" at 5806,6216 h60
  text "(Mixed)" at 6551.8,6216 h60
  text "28" at 727.42,6066 h60
  text "36.22mil (0.920mm)" at 1327.26,6066 h60
  text "PTH" at 2476.92,6066 h60
  text "Round" at 2982.8,6066 h60
  text "Top Layer - Bottom Layer" at 3716.6,6066 h60
  text "Pad" at 5216.15,6066 h60
  text "(Mixed)" at 5806,6066 h60
  text "(Mixed)" at 6551.8,6066 h60
  text "14" at 727.42,5916 h60
  text "37.40mil (0.950mm)" at 1327.26,5916 h60
  text "PTH" at 2476.92,5916 h60
  text "Round" at 2982.8,5916 h60
  text "Top Layer - Bottom Layer" at 3716.6,5916 h60
  text "Pad" at 5216.15,5916 h60
  text "(Mixed)" at 5806,5916 h60
  text "(Mixed)" at 6551.8,5916 h60
  text "16" at 727.42,5766 h60
  text "39.37mil (1.000mm)" at 1327.26,5766 h60
  text "PTH" at 2476.92,5766 h60
  text "Round" at 2982.8,5766 h60
  text "Top Layer - Bottom Layer" at 3716.6,5766 h60
  text "Pad" at 5216.15,5766 h60
  text "(Mixed)" at 5806,5766 h60
  text "(Mixed)" at 6551.8,5766 h60
  text "6" at 727.42,5616 h60
  text "41.73mil (1.060mm)" at 1327.26,5616 h60
  text "PTH" at 2476.92,5616 h60
  text "Round" at 2982.8,5616 h60
  text "Top Layer - Bottom Layer" at 3716.6,5616 h60
  text "Pad" at 5216.15,5616 h60
  text "(Mixed)" at 5806,5616 h60
  text "(Mixed)" at 6551.8,5616 h60
  text "2" at 727.42,5466 h60
  text "47.24mil (1.200mm)" at 1327.26,5466 h60
  text "PTH" at 2476.92,5466 h60
  text "Round" at 2982.8,5466 h60
  text "Top Layer - Bottom Layer" at 3716.6,5466 h60
  text "Pad" at 5216.15,5466 h60
  text "(Mixed)" at 5806,5466 h60
  text "(Mixed)" at 6551.8,5466 h60
  text "9" at 727.42,5316 h60
  text "50.00mil (1.270mm)" at 1327.26,5316 h60
  text "PTH" at 2476.92,5316 h60
  text "Round" at 2982.8,5316 h60
  text "Top Layer - Bottom Layer" at 3716.6,5316 h60
  text "Pad" at 5216.15,5316 h60
  text "(Mixed)" at 5806,5316 h60
  text "(Mixed)" at 6551.8,5316 h60
  text "24" at 727.42,5166 h60
  text "51.18mil (1.300mm)" at 1327.26,5166 h60
  text "PTH" at 2476.92,5166 h60
  text "Round" at 2982.8,5166 h60
  text "Top Layer - Bottom Layer" at 3716.6,5166 h60
  text "Pad" at 5216.15,5166 h60
  text "Rounded" at 5806,5166 h60
  text "(Mixed)" at 6551.8,5166 h60
  text "4" at 727.42,5016 h60
  text "59.06mil (1.500mm)" at 1327.26,5016 h60
  text "PTH" at 2476.92,5016 h60
  text "Round" at 2982.8,5016 h60
  text "Top Layer - Bottom Layer" at 3716.6,5016 h60
  text "Pad" at 5216.15,5016 h60
  text "(Mixed)" at 5806,5016 h60
  text "(Mixed)" at 6551.8,5016 h60
  text "2" at 727.42,4866 h60
  text "62.99mil (1.600mm)" at 1327.26,4866 h60
  text "PTH" at 2476.92,4866 h60
  text "Round" at 2982.8,4866 h60
  text "Top Layer - Bottom Layer" at 3716.6,4866 h60
  text "Pad" at 5216.15,4866 h60
  text "(Mixed)" at 5806,4866 h60
  text "(Mixed)" at 6551.8,4866 h60
  text "20" at 727.42,4716 h60
  text "66.93mil (1.700mm)" at 1327.26,4716 h60
  text "PTH" at 2476.92,4716 h60
  text "Round" at 2982.8,4716 h60
  text "Top Layer - Bottom Layer" at 3716.6,4716 h60
  text "Pad" at 5216.15,4716 h60
  text "(Mixed)" at 5806,4716 h60
  text "(Mixed)" at 6551.8,4716 h60
  text "2" at 727.42,4566 h60
  text "92.52mil (2.350mm)" at 1327.26,4566 h60
  text "NPTH" at 2476.92,4566 h60
  text "Round" at 2982.8,4566 h60
  text "Top Layer - Bottom Layer" at 3716.6,4566 h60
  text "Pad" at 5216.15,4566 h60
  text "Rounded" at 5806,4566 h60
  text "c0hn235" at 6551.8,4566 h60
  text "1" at 727.42,4416 h60
  text "137.79mil (3.500mm)" at 1327.26,4416 h60
  text "NPTH" at 2476.92,4416 h60
  text "Round" at 2982.8,4416 h60
  text "Top Layer - Bottom Layer" at 3716.6,4416 h60
  text "Pad" at 5216.15,4416 h60
  text "Rounded" at 5806,4416 h60
  text "c0hn350" at 6551.8,4416 h60
  text "248 Total" at 727.42,4266 h60

## Dimensions
0,3661.42 to 0,0 on Dimension
0,3661.42 to 4842.52,3661.42 on Dimension